# Altium PCB Audio-Player-v1.1.PcbDoc (part 2 of 3)
Units mil, origin at the board's own origin, x right, y up, seen from the top; angles counter-clockwise.
Board outline 4527.56 x 1574.8 mil, 4 copper layers (Top Layer, Ground, Power, Bottom Layer), stack 62.449 mil thick; 107 components, 72 nets, 372 pads, 147 vias.
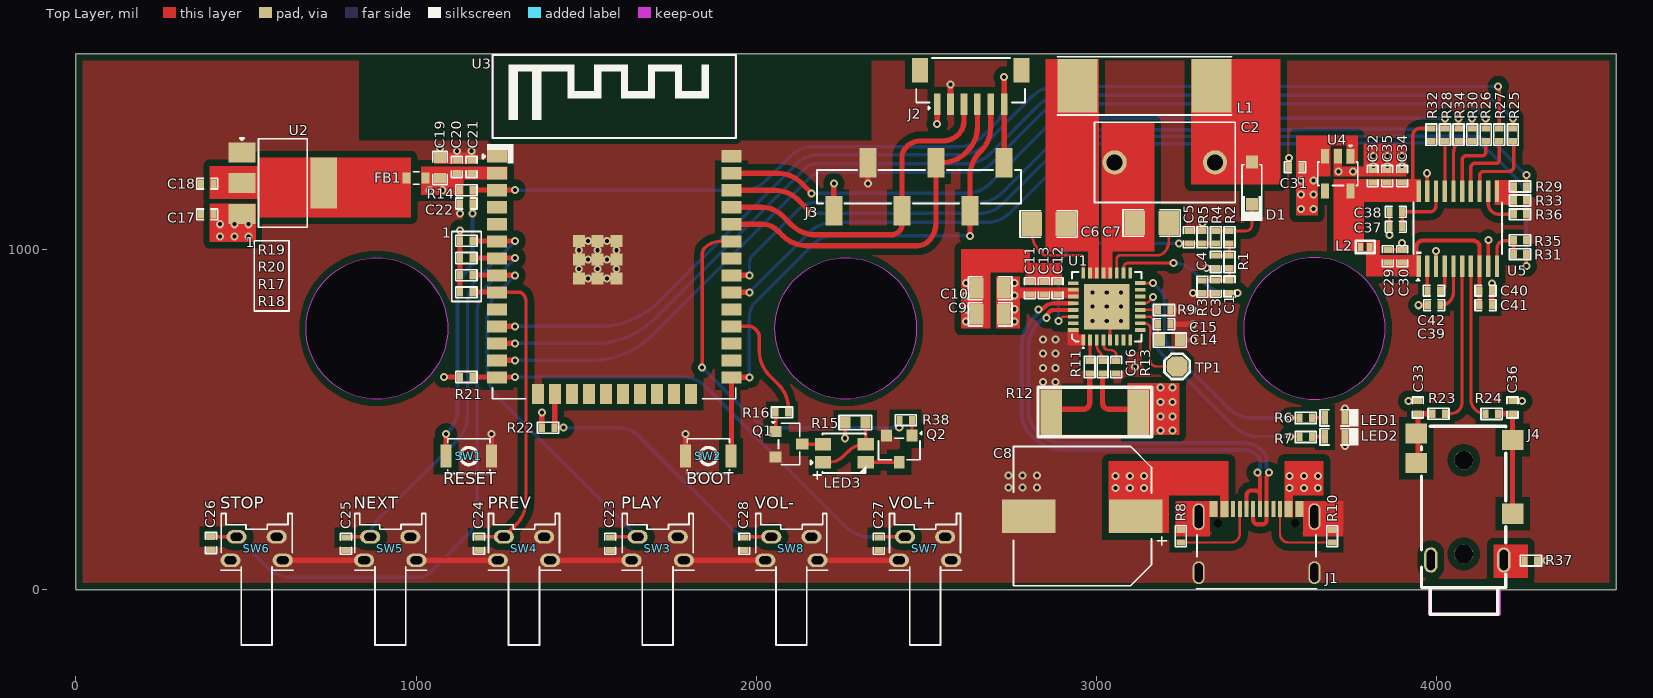
[diagram p0: Top Layer view]

## Part data (continued)
R1: library part RC0402FR-073K3L, "RES 3.3K OHM 1% 1/16W 0402", Case Code (Imperial)=0402, Case Code (Metric)=1005, LCSC Part Number=C137992, Manufacturer=Yageo, Max Operating Temperature=155°C, Max Power Dissipation=63mW, Min Operating Temperature=-55°C, Package Quantity=1, Power Rating=62.5mW, Resistance=3.3kR, Resistance Tolerance=1%, Resistor Type="Thick Film", Supplier Part Number 1=603-RC0402FR-073K3L, Temperature Coefficient=100ppm/°C, Voltage Rating=50V, Case/Package=0402, Category="Chip SMD Resistors", ComponentLink1Description=https://datasheet.ciiva.com/11808/0900766b80c66297-11808441.pdf?src-supplier=RSComponents, ComponentLink1URL=https://datasheet.ciiva.com/11808/0900766b80c66297-11808441.pdf?src-supplier=RSComponents, ComponentLink2Description=https://datasheet.ciiva.com/46394/1018594-46394940.pdf?src-supplier=Element14, ComponentLink2URL=https://datasheet.ciiva.com/46394/1018594-46394940.pdf?src-supplier=Element14, ComponentLink3Description=https://datasheet.ciiva.com/2453/pyu-r-int-thick-7-2453395.pdf?src-supplier=Digi-Key, ComponentLink3URL=https://datasheet.ciiva.com/2453/pyu-r-int-thick-7-2453395.pdf?src-supplier=Digi-Key, ComponentLink4Description=https://datasheet.ciiva.com/2453/pyu-r-int-thick-7-2453396.pdf?src-supplier=Digi-Key, ComponentLink4URL=https://datasheet.ciiva.com/2453/pyu-r-int-thick-7-2453396.pdf?src-supplier=Digi-Key, ComponentLink5Description=https://datasheet.ciiva.com/2453/pyu-r-int-thick-7-2453394.pdf?src-supplier=Digi-Key, ComponentLink5URL=https://datasheet.ciiva.com/2453/pyu-r-int-thick-7-2453394.pdf?src-supplier=Digi-Key, ComponentLink6Description=https://datasheet.ciiva.com/16746/pyu-rc0402-51-rohs-l-6-r-16746361.pdf?src-supplier=Future+Electronics, ComponentLink6URL=https://datasheet.ciiva.com/16746/pyu-rc0402-51-rohs-l-6-r-16746361.pdf?src-supplier=Future+Electronics, Construction=Rectangular, Depth=0.5mm, Features="Moisture Resistant", Height=0.016inch, Item Type=Resistor, Lead Free="Lead Free", Length=1mm, Manufacturer Part Number=RC0402FR-073K3L, Military Standard=Not, Number of Pins=2, Number of Terminations=2, Packaging="Tape and Reel", Pricing 1="1=0.10000, 10=0.01400, 50=0.01400, 100=0.00600, 1000=0.00300, 5000=0.00200, 10000=0.00100 (USD)", REACH SVHC="No SVHC", RoHS=Yes, RoHS Compliant=Yes, Series=RC, Size Code=0402, Stock 1=2413047, Supplier 1=Mouser, Technology="THICK FILM", Termination=SMD/SMT, Tolerance=1%, Voltage Rating (DC)=50V, Width=0.5mm
R2 R11 R13 R25 R26 R27 R28 R29 R30 R31 R37: library part RC0402FR-070RL, "RES 0 OHM JUMPER 1/16W 0402", Case Code (Imperial)=0402, Case Code (Metric)=1005, LCSC Part Number=C106231, Manufacturer=Yageo, Max Operating Temperature=155°C, Max Power Dissipation=63mW, Min Operating Temperature=-55°C, Power Rating=62.5mW, Resistor Type="Thick Film", Supplier Part Number 1=603-RC0402FR-070RL, Temperature Coefficient=200ppm/°C, Tolerance=1%, Voltage Rating=50V, Case/Package=0402, ComponentLink1Description=https://datasheet.ciiva.com/8896/pyu-rc0402-51-rohs-l-6-8896149.pdf?src-supplier=Avnet, ComponentLink1URL=https://datasheet.ciiva.com/8896/pyu-rc0402-51-rohs-l-6-8896149.pdf?src-supplier=Avnet, ComponentLink2Description=https://datasheet.ciiva.com/16790/pyu-rc0402-51-rohs-l-6-r-16790444.pdf?src-supplier=Future+Electronics, ComponentLink2URL=https://datasheet.ciiva.com/16790/pyu-rc0402-51-rohs-l-6-r-16790444.pdf?src-supplier=Future+Electronics, Contact Plating=Tin,Matte, Features="Moisture Resistant", Height=0.35mm, Item Type=Resistors, Lead Free="Lead Free", Length=1mm, Manufacturer Part Number=RC0402FR-070RL, Mount="Surface Mount", Number of Terminations=2, Packaging="Tape and Reel", Pricing 1="1=0.10000, 10=0.01400, 50=0.01400, 100=0.00600, 1000=0.00300, 5000=0.00200, 10000=0.00100 (USD)", Radiation Hardening=No, Resistance=0R, RoHS=Yes, RoHS Compliant=Yes, Series=RC, Size Code=0402, Stock 1=8556842, Supplier 1=Mouser, Termination=SMD/SMT, Width=0.5mm
R3: library part RC0402FR-0733KL, "RES 33K OHM 1% 1/16W 0402", LCSC Part Number=C138003, Manufacturer=YAGEO, Package=0402, ComponentLink1Description=LCSC, ComponentLink1URL=https://www.lcsc.com/product-detail/Chip-Resistor-Surface-Mount_YAGEO-RC0402FR-0733KL_C138003.html, Item Type=Resistor, Manufacturer Part Number=RC0402FR-0733KL
R4 R9: library part RT0402BRD07100KL, "RES SMD 100K OHM 0.1% 1/16W 0402", LCSC Part Number=C852472, Manufacturer=Yageo, Supplier Part Number=YAG1343CT-ND, Voltage Rating (DC)=50V, Category="Chip SMD Resistors", ComponentLink1Description=https://datasheet.ciiva.com/12724/pyu-rt-1-to-0-05-rohs-l-4-12724954.pdf?src-supplier=Mouser, ComponentLink1URL=https://datasheet.ciiva.com/12724/pyu-rt-1-to-0-05-rohs-l-4-12724954.pdf?src-supplier=Mouser, Item Type=Resistor, Manufacturer Part Number=RT0402BRD07100KL, Pricing="1=0.16, 10=0.121, 50=0.0958, 100=0.0859, 500=0.0654, 1000=0.0578, 5000=0.04283 (USD)", RoHS=Yes, Stock=62932, Supplier=Digikey
R5 R14 R17 R18 R19 R20 R21 R22 R32 R33 R34 R35 R36: library part RC0402FR-0710KL, "RES 10K OHM 1% 1/16W 0402", Case Code (Imperial)=0402, Case Code (Metric)=1005, LCSC Part Number=C60490, Manufacturer=Yageo, Max Operating Temperature=155°C, Max Power Dissipation=63mW, Min Operating Temperature=-55°C, Power Rating=62.5mW, Resistance=10kR, Resistance Tolerance=1%, Resistor Type="Thick Film", Supplier Part Number 1=603-RC0402FR-0710KL, Temperature Coefficient=100ppm/°C, Voltage Rating=50V, Case/Package=0402, Category="Chip SMD Resistors", ComponentLink1Description=https://datasheet.ciiva.com/7660/38568-7660787.pdf?src-supplier=Element14, ComponentLink1URL=https://datasheet.ciiva.com/7660/38568-7660787.pdf?src-supplier=Element14, ComponentLink2Description=https://datasheet.ciiva.com/7849/1686128-7849814.pdf?src-supplier=Element14, ComponentLink2URL=https://datasheet.ciiva.com/7849/1686128-7849814.pdf?src-supplier=Element14, ComponentLink3Description=https://datasheet.ciiva.com/7983/1018594-7983486.pdf?src-supplier=Element14, ComponentLink3URL=https://datasheet.ciiva.com/7983/1018594-7983486.pdf?src-supplier=Element14, ComponentLink4Description=https://datasheet.ciiva.com/22747/1018594-22747512.pdf?src-supplier=Element14, ComponentLink4URL=https://datasheet.ciiva.com/22747/1018594-22747512.pdf?src-supplier=Element14, ComponentLink5Description=https://datasheet.ciiva.com/12667/pyu-rc0402-51-rohs-l-6-r-12667067.pdf?src-supplier=Mouser, ComponentLink5URL=https://datasheet.ciiva.com/12667/pyu-rc0402-51-rohs-l-6-r-12667067.pdf?src-supplier=Mouser, ComponentLink6Description=https://datasheet.ciiva.com/7849/1784430-7849813.pdf?src-supplier=Element14, ComponentLink6URL=https://datasheet.ciiva.com/7849/1784430-7849813.pdf?src-supplier=Element14, ComponentLink7Description=https://datasheet.ciiva.com/7849/1784430-7849815.pdf?src-supplier=Element14, ComponentLink7URL=https://datasheet.ciiva.com/7849/1784430-7849815.pdf?src-supplier=Element14, Construction=Rectangular, Depth=0.5mm, Features="Moisture Resistant", Height=0.32mm, Item Type=Resistor, Lead Free="Lead Free", Lead Pitch=0.2mm, Length=1mm, Manufacturer Part Number=RC0402FR-0710KL, Military Standard=Not, Number of Pins=2, Number of Terminations=2, Packaging="Tape and Reel", Pricing 1="1=0.10000, 10=0.01400, 50=0.01400, 100=0.00500, 1000=0.00300, 10000=0.00200 (USD)", REACH SVHC="No SVHC", RoHS=Yes, RoHS Compliant=Yes, Series=RC, Stock 1=18648329, Supplier 1=Mouser, Termination=SMD/SMT, Tolerance=1%, Voltage Rating (DC)=50V, Width=0.5mm, Working Voltage=50V
R6 R7 R16 R38: library part RC0402FR-071KL, "RES 1K OHM 1% 1/16W 0402", Case Code (Imperial)=0402, Case Code (Metric)=1005, LCSC Part Number=C106235, Manufacturer=Yageo, Max Operating Temperature=155°C, Max Power Dissipation=63mW, Min Operating Temperature=-55°C, Power Rating=62.5mW, Resistance=1kR, Resistance Tolerance=1%, Resistor Type="Thick Film", Temperature Coefficient=100ppm/°C, Voltage Rating=50V, Case/Package=0402, Category="Chip SMD Resistors", ComponentLink1Description=https://datasheet.ciiva.com/11819/0900766b80c66297-11819477.pdf?src-supplier=RSComponents, ComponentLink1URL=https://datasheet.ciiva.com/11819/0900766b80c66297-11819477.pdf?src-supplier=RSComponents, ComponentLink2Description=https://datasheet.ciiva.com/7983/1018594-7983502.pdf?src-supplier=Element14, ComponentLink2URL=https://datasheet.ciiva.com/7983/1018594-7983502.pdf?src-supplier=Element14, ComponentLink3Description=https://datasheet.ciiva.com/22747/1018594-22747513.pdf?src-supplier=Element14, ComponentLink3URL=https://datasheet.ciiva.com/22747/1018594-22747513.pdf?src-supplier=Element14, ComponentLink4Description=https://datasheet.ciiva.com/12666/pyu-rc0402-51-rohs-l-6-r-12666741.pdf?src-supplier=Mouser, ComponentLink4URL=https://datasheet.ciiva.com/12666/pyu-rc0402-51-rohs-l-6-r-12666741.pdf?src-supplier=Mouser, ComponentLink5Description=https://datasheet.ciiva.com/7849/1018594-7849869.pdf?src-supplier=Element14, ComponentLink5URL=https://datasheet.ciiva.com/7849/1018594-7849869.pdf?src-supplier=Element14, ComponentLink6Description=https://datasheet.ciiva.com/7849/1018594-7849871.pdf?src-supplier=Element14, ComponentLink6URL=https://datasheet.ciiva.com/7849/1018594-7849871.pdf?src-supplier=Element14, ComponentLink7Description=https://datasheet.ciiva.com/17063/pyu-rc0402-51-rohs-l-6-r-17063193.pdf?src-supplier=Future+Electronics, ComponentLink7URL=https://datasheet.ciiva.com/17063/pyu-rc0402-51-rohs-l-6-r-17063193.pdf?src-supplier=Future+Electronics, Construction=Rectangular, Depth=0.5mm, Features="Moisture Resistant", Height=0.32mm, Item Type=Resistor, Lead Free="Lead Free", Length=1mm, Manufacturer Part Number=RC0402FR-071KL, Military Standard=Not, Number of Pins=2, Number of Terminations=2, Packaging="Tape and Reel", Pricing 1="10000=0.00085, 20000=0.00087, 40000=0.00084, 60000=0.00083, 80000=0.00079, 100000=0.00078, 1000000=0.00076 (USD)", Reach SVHC Compliant=Yes, RoHS=Yes, RoHS Compliant=Yes, Series=RC, Size Code=0402, Stock 1=13030000, Supplier 1=Avnet, Supplier Part Number 1=RC0402FR-071KL, Technology="THICK FILM", Termination=SMD/SMT, Tolerance=1%, Voltage Rating (DC)=50V, Width=0.5mm
R8 R10: library part RC0402FR-075K1L, "RES 5.1K OHM 1% 1/16W 0402", Case Code (Imperial)=0402, Case Code (Metric)=1005, LCSC Part Number=C105872, Manufacturer=Yageo, Max Operating Temperature=155°C, Max Power Dissipation=63mW, Min Operating Temperature=-55°C, Package Quantity=1, Resistance=5.1kR, Resistance Tolerance=1%, Resistor Type="Thick Film", Temperature Coefficient=100ppm/°C, Voltage Rating=50V, Case/Package=0402, Category="Chip SMD Resistors", ComponentLink1Description=https://datasheet.ciiva.com/7983/1018594-7983519.pdf?src-supplier=Element14, ComponentLink1URL=https://datasheet.ciiva.com/7983/1018594-7983519.pdf?src-supplier=Element14, ComponentLink2Description=https://datasheet.ciiva.com/46394/1018594-46394936.pdf?src-supplier=Element14, ComponentLink2URL=https://datasheet.ciiva.com/46394/1018594-46394936.pdf?src-supplier=Element14, ComponentLink3Description=https://datasheet.ciiva.com/2453/pyu-r-int-thick-7-2453401.pdf?src-supplier=Digi-Key, ComponentLink3URL=https://datasheet.ciiva.com/2453/pyu-r-int-thick-7-2453401.pdf?src-supplier=Digi-Key, ComponentLink4Description=https://datasheet.ciiva.com/2453/pyu-r-int-thick-7-2453402.pdf?src-supplier=Digi-Key, ComponentLink4URL=https://datasheet.ciiva.com/2453/pyu-r-int-thick-7-2453402.pdf?src-supplier=Digi-Key, ComponentLink5Description=https://datasheet.ciiva.com/2453/pyu-r-int-thick-7-2453400.pdf?src-supplier=Digi-Key, ComponentLink5URL=https://datasheet.ciiva.com/2453/pyu-r-int-thick-7-2453400.pdf?src-supplier=Digi-Key, ComponentLink6Description=https://datasheet.ciiva.com/12558/pyu-rc0402-51-rohs-l-6-r-8721-12558460.pdf?src-supplier=Mouser, ComponentLink6URL=https://datasheet.ciiva.com/12558/pyu-rc0402-51-rohs-l-6-r-8721-12558460.pdf?src-supplier=Mouser, ComponentLink7Description=https://datasheet.ciiva.com/16744/pyu-rc0402-51-rohs-l-6-r-16744283.pdf?src-supplier=Future+Electronics, ComponentLink7URL=https://datasheet.ciiva.com/16744/pyu-rc0402-51-rohs-l-6-r-16744283.pdf?src-supplier=Future+Electronics, ComponentLink8Description=https://datasheet.ciiva.com/15189/getdatasheetpartid-323636-15189493.pdf?src-supplier=Verical, ComponentLink8URL=https://datasheet.ciiva.com/15189/getdatasheetpartid-323636-15189493.pdf?src-supplier=Verical, Construction=Rectangular, Depth=0.5mm, Features="Moisture Resistant", Height=0.016inch, Item Type=Resistor, Lead Free="Lead Free", Length=1mm, Manufacturer Part Number=RC0402FR-075K1L, Military Standard=Not, Number of Terminations=2, Packaging="Tape and Reel", Power Rating=63mW, Pricing 1="10000=0.00085 (USD)", RoHS=Yes, RoHS Compliant=Yes, Series=RC, Stock 1=65000, Supplier 1=Avnet, Supplier Part Number 1=RC0402FR-075K1L, Technology="THICK FILM", Termination=SMD/SMT, Tolerance=1%, Voltage Rating (DC)=50V, Width=0.02inch, Working Voltage=50V
R12: library part PA2512FKE7W0R02E, "RES 0.02 OHM 1% 2W 2512", LCSC Part Number=C375689, Manufacturer=Yageo, ComponentLink1Description=https://datasheet.octopart.com/PA2512FKE7W0R02E-Yageo-datasheet-137700559.pdf?src-supplier=Newark, ComponentLink1URL=https://datasheet.octopart.com/PA2512FKE7W0R02E-Yageo-datasheet-137700559.pdf?src-supplier=Newark, Item Type=Resistor, Manufacturer Part Number=PA2512FKE7W0R02E, Pricing="1=0.79, 10=0.514, 25=0.4384, 50=0.3908, 100=0.3503, 250=0.306, 500=0.27824, 1000=0.25464 (USD)", RoHS=No, Stock=3212, Supplier=Digikey
R15: library part RC0603FR-07470RL, "RES 470 OHM 1% 1/10W 0603", Case Code (Imperial)=0603, Case Code (Metric)=1608, LCSC Part Number=C114669, Manufacturer=Yageo, Max Operating Temperature=155°C, Max Power Dissipation=100mW, Min Operating Temperature=-55°C, Package Quantity=1, Resistance Tolerance=1%, Resistor Type="Thick Film", Supplier Part Number 1=311-470HRCT-ND, Temperature Coefficient=100ppm/°C, Voltage Rating=50V, Working Voltage=75V, Case/Package=0603, Category="Chip SMD Resistors", ComponentLink1Description=https://datasheet.ciiva.com/11808/0900766b80f96399-11808177.pdf?src-supplier=RSComponents, ComponentLink1URL=https://datasheet.ciiva.com/11808/0900766b80f96399-11808177.pdf?src-supplier=RSComponents, ComponentLink2Description=https://datasheet.ciiva.com/7746/1738695-7746359.pdf?src-supplier=Element14, ComponentLink2URL=https://datasheet.ciiva.com/7746/1738695-7746359.pdf?src-supplier=Element14, ComponentLink3Description=https://datasheet.ciiva.com/7746/1738695-7746360.pdf?src-supplier=Element14, ComponentLink3URL=https://datasheet.ciiva.com/7746/1738695-7746360.pdf?src-supplier=Element14, ComponentLink4Description=https://datasheet.ciiva.com/7660/1868787-7660793.pdf?src-supplier=Element14, ComponentLink4URL=https://datasheet.ciiva.com/7660/1868787-7660793.pdf?src-supplier=Element14, ComponentLink5Description=https://datasheet.ciiva.com/46440/1868787-46440907.pdf?src-supplier=Element14, ComponentLink5URL=https://datasheet.ciiva.com/46440/1868787-46440907.pdf?src-supplier=Element14, ComponentLink6Description=https://datasheet.ciiva.com/2454/pyu-r-int-thick-7-2454012.pdf?src-supplier=Digi-Key, ComponentLink6URL=https://datasheet.ciiva.com/2454/pyu-r-int-thick-7-2454012.pdf?src-supplier=Digi-Key, ComponentLink7Description=https://datasheet.ciiva.com/2454/pyu-r-int-thick-7-2454013.pdf?src-supplier=Digi-Key, ComponentLink7URL=https://datasheet.ciiva.com/2454/pyu-r-int-thick-7-2454013.pdf?src-supplier=Digi-Key, ComponentLink8Description=https://datasheet.ciiva.com/2454/pyu-r-int-thick-7-2454014.pdf?src-supplier=Digi-Key, ComponentLink8URL=https://datasheet.ciiva.com/2454/pyu-r-int-thick-7-2454014.pdf?src-supplier=Digi-Key, Construction=Rectangular, Depth=0.8mm, Features="Moisture Resistant", Height=0.022inch, Lead Free="Lead Free", Length=1.6mm, Manufacturer Part Number=RC0603FR-07470RL, Military Standard=Not, Number of Terminations=2, Packaging="Tape and Reel", Power Rating=100mW, Pricing 1="1=0.10000, 10=0.02400, 100=0.00970, 1000=0.00436, 2500=0.00378 (USD)", REACH SVHC="No SVHC", Resistance=470R, RoHS=Yes, RoHS Compliant=Yes, Series=RC, Stock 1=154083, Supplier 1=Digi-Key, Technology="THICK FILM", Termination=SMD/SMT, Tolerance=1%, Width=0.031inch
R23 R24: library part RC0402FR-07470RL, "RES 470 OHM 1% 1/16W 0402", Case Code (Imperial)=0402, Case Code (Metric)=1005, LCSC Part Number=C114877, Manufacturer=Yageo, Max Operating Temperature=155°C, Max Power Dissipation=63mW, Min Operating Temperature=-55°C, Package Quantity=1, Power Rating=62.5mW, Resistance Tolerance=1%, Resistor Type="Thick Film", Temperature Coefficient=100ppm/°C, Voltage Rating=50V, Case/Package=0402, ComponentLink1Description=https://datasheet.ciiva.com/46412/1018594-46412838.pdf?src-supplier=Element14, ComponentLink1URL=https://datasheet.ciiva.com/46412/1018594-46412838.pdf?src-supplier=Element14, ComponentLink2Description=https://datasheet.ciiva.com/2453/pyu-r-int-thick-7-2453377.pdf?src-supplier=Digikey, ComponentLink2URL=https://datasheet.ciiva.com/2453/pyu-r-int-thick-7-2453377.pdf?src-supplier=Digikey, ComponentLink3Description=https://datasheet.ciiva.com/2453/pyu-r-int-thick-7-2453378.pdf?src-supplier=Digikey, ComponentLink3URL=https://datasheet.ciiva.com/2453/pyu-r-int-thick-7-2453378.pdf?src-supplier=Digikey, ComponentLink4Description=https://datasheet.ciiva.com/2453/pyu-r-int-thick-7-2453376.pdf?src-supplier=Digikey, ComponentLink4URL=https://datasheet.ciiva.com/2453/pyu-r-int-thick-7-2453376.pdf?src-supplier=Digikey, ComponentLink5Description=https://datasheet.ciiva.com/7850/1018594-7850015.pdf?src-supplier=Element14, ComponentLink5URL=https://datasheet.ciiva.com/7850/1018594-7850015.pdf?src-supplier=Element14, ComponentLink6Description=https://datasheet.ciiva.com/7850/1018594-7850014.pdf?src-supplier=Element14, ComponentLink6URL=https://datasheet.ciiva.com/7850/1018594-7850014.pdf?src-supplier=Element14, ComponentLink7Description=https://datasheet.ciiva.com/15189/getdatasheetpartid-330246-15189463.pdf?src-supplier=Verical, ComponentLink7URL=https://datasheet.ciiva.com/15189/getdatasheetpartid-330246-15189463.pdf?src-supplier=Verical, Construction=Rectangular, Depth=0.5mm, Features="Moisture Resistant", Height=0.016inch, Item Type=Resistor, Lead Free="Lead Free", Length=1mm, Manufacturer Part Number=RC0402FR-07470RL, Military Standard=Not, Number of Terminations=2, Packaging="Tape and Reel", Pricing="10000=0.00085 (USD)", Reach SVHC Compliant=No, RoHS=Yes, RoHS Compliant=Yes, Series=RC, Stock=10000, Supplier=Avnet, Supplier Part Number=RC0402FR-07470RL, Termination=SMD/SMT, Tolerance=1%, Voltage Rating (AC)=50V, Width=0.02inch, Working Voltage=50V
SW1 SW2: "SWITCH TACTILE SPST-NO 0.05A 12V", Contact Current Rating=50mA, Contact Resistance=100mR, Insulation Resistance=100MR, LCSC Part Number=C231329, Manufacturer=Omron, Max Operating Temperature=70°C, Max Voltage Rating (DC)=12V, Min Operating Temperature=-25°C, Operating Force=1.5N, Package Quantity=1, Ratings="Dust Proof,IP40", Supplier Part Number 1=SW1020DKR-ND, Actuator Length=0.4mm, Actuator Type=Standard, ComponentLink1Description=http://www.farnell.com/datasheets/60838.pdf?src-supplier=Farnell, ComponentLink1URL=http://www.farnell.com/datasheets/60838.pdf?src-supplier=Farnell, ComponentLink2Description=http://www.farnell.com/datasheets/60838.pdf?src-supplier=Element14, ComponentLink2URL=http://www.farnell.com/datasheets/60838.pdf?src-supplier=Element14, ComponentLink3Description=https://omronfs.omron.com/en_US/ecb/products/pdf/en-b3u.pdf?src-supplier=Digi-Key, ComponentLink3URL=https://omronfs.omron.com/en_US/ecb/products/pdf/en-b3u.pdf?src-supplier=Digi-Key, ComponentLink4Description=http://www.omron.com/ecb/products/pdf/en-b3u.pdf?src-supplier=Digi-Key, ComponentLink4URL=http://www.omron.com/ecb/products/pdf/en-b3u.pdf?src-supplier=Digi-Key, ComponentLink5Description=https://www.distrelec.biz/Web/Downloads/he/et/B3U_eng_datasheet.pdf?mime=application%2Fpdf&src-supplier=Distrelec, ComponentLink5URL=https://www.distrelec.biz/Web/Downloads/he/et/B3U_eng_datasheet.pdf?mime=application%2Fpdf&src-supplier=Distrelec, ComponentLink6Description=http://www.onlinecomponents.com/productFiles/mf-OM/en-b3u.pdf?src-supplier=Onlinecomponents.com, ComponentLink6URL=http://www.onlinecomponents.com/productFiles/mf-OM/en-b3u.pdf?src-supplier=Onlinecomponents.com, ComponentLink7Description=https://www.verical.com/server-webapp/html/getDatasheet?partID=552554&src-supplier=Verical, ComponentLink7URL=https://www.verical.com/server-webapp/html/getDatasheet?partID=552554&src-supplier=Verical, ComponentLink8Description=http://www.farnell.com/datasheets/1685550.pdf?src-supplier=Element14, ComponentLink8URL=http://www.farnell.com/datasheets/1685550.pdf?src-supplier=Element14, ComponentLink9Description=http://www.farnell.com/datasheets/2610940.pdf?src-supplier=Farnell, ComponentLink9URL=http://www.farnell.com/datasheets/2610940.pdf?src-supplier=Farnell, ComponentLink10Description=https://www.alliedelec.com/m/d/4c8a9ef82804fc3c241a13c1e298fd73.pdf?src-supplier=Allied+Electronics, ComponentLink10URL=https://www.alliedelec.com/m/d/4c8a9ef82804fc3c241a13c1e298fd73.pdf?src-supplier=Allied+Electronics, Contact Material=Silver, Current Rating=50mA, Depth=2.5mm, Electrical Life=200000Cycles, Height=1.2mm, Illumination Type=Non-Illuminated,Illuminated, Item Type=Switch, Lead Free="Lead Free", Length=4mm, Manufacturer Part Number=B3U-1000P, Max Current Rating=50mA, Mechanical Life=200000Cycles, Mount="Surface Mount", Orientation=Straight, Packaging="Tape and Reel", Pricing 1="1=1, 10=0.961, 25=0.9064, 50=0.7976, 100=0.7251, 250=0.68888, 500=0.67074, 1000=0.52571 (USD)", REACH SVHC=Unknown, Stock 1=116454, Supplier 1=Digi-Key, Switch Function=Off-Mom, Switch Travel=0.15mm, Termination=SMD/SMT, Throw Configuration=SPST, Voltage Rating (DC)=12V, Weight=0.000776oz, Width=3mm
SW3 SW4 SW5 SW6 SW7 SW8: "With Bracket 5mm 12V 5.3mm Round Button No SPST 50mA Through Hole Tactile Switches ROHS", LCSC Part Number=C5446822, Manufacturer=G-Switch, Package=Plugin, ComponentLink1Description=LCSC, ComponentLink1URL=https://www.lcsc.com/product-detail/C5446822.html?s_z=n_GT-TB092B-H090-L1, Item Type=Switch, Manufacturer Part Number=GT-TB092B-H090-L1
TP1: "Test Point ON", Item Type="TEST POINT"
U1: "4.5V~12V QFN-32-EP(5x5) Battery Management ROHS", LCSC Part Number=C515681, Manufacturer=INJOINIC, Package=QFN-32-EP(5x5), ComponentLink1Description=LCSC, ComponentLink1URL=https://lcsc.com/product-detail/Battery-Management_INJOINIC-IP6806_NF_C515681.html?s_z=n_IP6806, Item Type=IC, Manufacturer Part Number=IP6806_NF
U2: "IC REG LINEAR 3.3V 1.2A SOT223", Case/Package=TO-261-4, Dropout Voltage=600mV, LCSC Part Number=C435835, Manufacturer=STMicroelectronics, Max Input Voltage=18V, Max Operating Temperature=125°C, Min Operating Temperature=-40°C, Min Output Voltage=3.3V, Output Current=1.2A, Power Supply Rejection Ratio (PSRR)=65dB, Quiescent Current=500uA, Supplier Part Number 1=497-17239-6-ND, ComponentLink1Description=LCSC, ComponentLink1URL=https://www.lcsc.com/product-detail/Linear-Voltage-Regulators-LDO_STMicroelectronics-LDL1117S33R_C435835.html, Item Type=IC, Manufacturer Part Number=LDL1117S33R, Mount="Surface Mount", Number of Regulators=1, Output Configuration=Positive, Output Type=Fixed, Packaging="Tape and Reel", Pricing 1="1=0.45, 10=0.362, 100=0.2465, 500=0.1849, 1000=0.13867 (USD)", Stock 1=13064, Supplier 1=Digi-Key
U3: "RX TXRX MOD WIFI TRACE ANT SMD", LCSC Part Number=C701343, Manufacturer="Espressif Systems", Supplier Part Number 1=1965-ESP32-WROOM-32E-N16CT-ND, Category=Uncategorized, Item Type=IC, Manufacturer Part Number=ESP32-WROOM-32E-N16, Pricing 1="1=3.60000 (USD)", RoHS=No, Stock 1=16240, Supplier 1=Digi-Key
U4: "IC REG LINEAR 3.3V 300MA SOT23-5", LCSC Part Number=C156285, Manufacturer=Diodes, ComponentLink1Description=https://datasheet.ciiva.com/30016/ap2127-30016760.pdf?src-supplier=Avnet, ComponentLink1URL=https://datasheet.ciiva.com/30016/ap2127-30016760.pdf?src-supplier=Avnet, ComponentLink2Description=https://datasheet.ciiva.com/29569/ap2127-29569893.pdf?src-supplier=Digikey, ComponentLink2URL=https://datasheet.ciiva.com/29569/ap2127-29569893.pdf?src-supplier=Digikey, Item Type=IC, Manufacturer Part Number=AP2127K-3.3TRG1, Pricing="3000=0.0623, 6000=0.0623 (USD)", RoHS=Yes, Stock=45000, Supplier="Arrow Electronics"
U5: "IC DAC 16/24/32BIT 384K 20TSSOP", LCSC Part Number=595-PCM5102APWR, Manufacturer="Texas Instruments", ComponentLink1Description=https://datasheet.ciiva.com/24021/slas859a-261040-24021907.pdf?src-supplier=Mouser, ComponentLink1URL=https://datasheet.ciiva.com/24021/slas859a-261040-24021907.pdf?src-supplier=Mouser, ComponentLink2Description=https://datasheet.ciiva.com/29648/pcm5102a-29648362.pdf?src-supplier=Digikey, ComponentLink2URL=https://datasheet.ciiva.com/29648/pcm5102a-29648362.pdf?src-supplier=Digikey, ComponentLink3Description=https://datasheet.ciiva.com/6673/pcm5102a-6673611.pdf?src-supplier=Digikey, ComponentLink3URL=https://datasheet.ciiva.com/6673/pcm5102a-6673611.pdf?src-supplier=Digikey, Item Type=IC, Manufacturer Part Number=PCM5102APWR, Pricing="1=4.43, 10=3.32, 50=3.07, 100=2.75, 1000=2.36, 10000=2.35 (USD)", RoHS=Yes, Stock=2139, Supplier=Mouser

## Via types
v1: diameter 23.62, hole 11.81, Top Layer to Bottom Layer, tented both sides, 147 vias

## Nets (pads, with @x,y where several pads share a name; then routed paths per layer and width w, separated by ;. In a path a pad name is that pad's centre, name@x,y a point inside that pad or via, vN(x,y) a via of type N, cw(c..) or ccw(c..) an arc to the next point about the centre after c; other vN are vias at no path point)
3V3: C19.2 C20.2 C21.2 FB1.2 J2.1 J3.1 R14.2 R17.2 R18.2 R19.2 R20.2 R21.2 R22.2 U3.2 | length 415.7
  Top Layer w15.33: v1(1082.35,625) R21.2@1129.43,625 ; R18.2@1129.43,873.85 R17.2@1129.43,924.38 R20.2@1129.43,974.91 R19.2@1129.43,1025.44 v1(1129.43,1056.28) ; R22.2@1369.69,476 v1(1369.69,521) ; J3.1@2228,1113.27 v1@2228,1196.28 ; v1(2531.87,1369.15) J2.1@2531.87,1427.3
  other v1: 1040.11,1174 1077.11,1174 2228,1194
3V3#: C18.2 FB1.1 U2.2 U2.4
3V3-CODEC: C32.2 C34.2 C35.2 L2.1 R32.1 U4.5 U5.20 | length 206.1
  Top Layer w10: 3930,1195 3930,1334.06 cw(c3951.94,1334.06) 3951.94,1356 R32.1@3984.55,1356
5V: C8.1 C9.2 C10.2 C11.2 C12.2 C13.2 C17.2 C31.2 J1.A4/B9 J1.B4/A9 R15.1 U1.26 U1.27 U2.3 U4.1 U4.3 | length 46.2
  Top Layer w10: v1(2261,445) 2261.31,445.31 R15.1@2261.31,491.02
  other v1: 3055.92,298.09 3097.92,298.09 3139.92,298.09 3567.86,298.09 3609.86,298.09 3651.86,298.09 3055.92,334.09 3097.92,334.09 3139.92,334.09 3567.86,334.09 3609.86,334.09 3651.86,334.09 2759,788.2 2759,824.2 2759,865 2759,901 423.92,1038.09 465.92,1038.09 507.92,1038.09 423.92,1074.09 465.92,1074.09 507.92,1074.09 3601.97,1119.09 3637.97,1119.09 3601.97,1161.09 3637.97,1161.09 3601.97,1203.09 3637.97,1203.09
AGND: C29.1 C30.1 C32.1 C33.1 C34.1 C35.1 C36.1 C37.1 C38.1 C40.1 C41.1 C42.2 J4.1 R37.2 U4.2 U5.3 U5.9 U5.19 | length 644.7
  Top Layer w10: v1(3711.53,1229.5) 3716,1233.97 C34.1@3898.55,1233.97 ; C29.1@3856.05,998.54 C30.1@3898.55,998.54 v1(3898.55,1019.35) ; v1(3861,1043) 3861.55,1043 C37.1@3861.55,1066.37 C38.1@3861.55,1110.38 ; v1@3972.05,1229 3972.05,1171.47 U5.19@3972.69,1171.47 ; U5.3@3998.28,951 v1(3998.28,995.73) ; U5.9@4151.82,951 v1(4151.82,1027.25)
  Top Layer w15.33: v1(3917.7,554) C33.1@3945,554 ; v1(3947.2,836) C42.2@3974.5,836 ; C41.1@4162.32,836 C40.1@4162.32,879 v1(4162.32,899.5) ; C36.1@4223.14,554 v1(4250.44,554)
  other v1: 3972.05,1224 3754.52,1229.5 3813.88,1245.22 3855.88,1245.22 3897.88,1245.22 3813.88,1274.22 3855.88,1274.19 3897.88,1274.19
AVDD: C29.2 C30.2 C40.2 C41.2 L2.2 U5.1 U5.8 | length 438.3
  Top Layer w12: U5.1@3947.1,951 cw(c3947.1,957.3) 3940.8,957.3 3940.8,1007.54 cw(c3959.26,1007.54) 3959.26,1026 4106.94,1026 cw(c4106.94,1006.71) 4126.23,1006.71 U5.8@4126.23,951 4126.23,836.91 cw(c4125.32,836.91) C41.2@4125.32,836
DEMPH: R31.1 R35.2 U5.10 | length 155.8
  Top Layer w10: U5.10@4177.41,951 4177.41,1002.41 cw(c4201,1002.41) 4201,1026 4225.3,1026 ccw(c4225.3,1027.25) R35.2@4226.55,1027.25 R31.1@4226.55,986.17
EN: C22.2 J2.6 J3.6 R14.1 SW1.2 U3.3 | length 2803.9
  Top Layer w10: v1(1088,457) v1@1088.18,456.82 ; J3.6@2728,1255 ccw(c2726.25,1256.75) J3.6@2728.73,1256.75
  Top Layer w15.33: SW1.2@1088.18,392.61 v1@1088.18,456.82 ; v1(1166.43,1106.28) C22.2@1166.43,1135 R14.1@1166.43,1174 ; R14.1@1166.43,1174.5 U3.3@1238.11,1174.5 ; U3.3@1238.11,1174 cw(c1239.32,1172.79) 1239.32,1174.5 v1(1291,1174.5) ; J3.6@2728.73,1256.75 J2.6@2728.73,1427.3 v1(2728.73,1507)
  Bottom Layer w10: v1(1291,1174.5) 1959.24,1174.5 ccw(c1959.24,1274.5) 2029.95,1203.79 2100.67,1274.5 cw(c2167.06,1208.11) 2167.06,1302 2592.91,1302 ccw(c2592.91,1402) 2663.62,1331.29 2711.34,1379 ccw(c2627.73,1433.86) 2727.73,1433.86 2727.73,1504.59 cw(c2731.14,1504.59) v1(2728.73,1507)
  Bottom Layer w11.81: v1(1088,457) 1092.42,461.42 ccw(c1021.71,532.13) 1121.71,532.13 1121.71,868.47 cw(c1221.71,868.47) 1151,939.18 ccw(c1113.76,976.42) 1166.43,976.42 v1(1166.43,1106.28)
FILTER: R29.1 R33.2 U5.11
FORMAT: R30.1 R34.2 U5.16 | length 191.5
  Top Layer w10: U5.16@4049.46,1171.47 4049.46,1282.81 cw(c4100.65,1282.81) R34.2@4064.45,1319 R30.1@4104.41,1319
GND: C3.1 C4.1 C5.1 C8.2 C14.2 C15.2 C16.1 C17.1 C18.1 C19.1 C20.1 C21.1 C22.1 C23.1 C24.1 C25.1 C26.1 C27.1 C28.1 C31.1 J1.A1/B12 J1.B1/A12 J1.S1 J1.S2 J1.S3 J1.S4 J2.2 J3.2 LED1.2 LED2.2 Q1.2 Q2.2 R3.1 R5.1 R8.2 R9.2 R10.2 R11.1 R12.2 R33.1 R34.1 R35.1 R36.1 R37.1 SW1.1 SW2.1 SW3.2 SW3.3 SW3.4 SW4.2 SW4.3 SW4.4 SW5.2 SW5.3 SW5.4 SW6.2 SW6.3 SW6.4 SW7.2 SW7.3 SW7.4 SW8.2 SW8.3 SW8.4 U1.1 U1.32 U2.1 U3.1 U3.15 U3.38 U3.39 U3.39_11 U3.39_20 U3.40 U3.41 U3.42 U3.43 U3.44 U3.45 U3.46 U3.47 | length 2152.1
  Top Layer w10: v1@2328,1196.41 ccw(c2331.41,1196.41) v1(2329,1194) ; C5.1@3271.3,1054.4 R5.1@3311.4,1054.4 v1(3311.4,1077.9) ; R34.1@4064.45,1356 v1(4064.45,1385)
  Top Layer w15.33: SW6.4@608,86.26 SW5.3@847.46,86.26 ; SW5.4@1001,86.26 SW4.3@1240.46,86.26 ; v1(1129.43,1106.28) C22.1@1129.43,1135 ; SW1.1@1222.04,392.61 v1@1222.04,456.82 ; SW4.4@1394,86.26 SW3.3@1633.46,86.26 ; SW3.4@1787,86.26 SW8.3@2026.46,86.26 ; SW2.1@1792.32,392.61 v1@1792.32,456.82 ; SW8.4@2180,86.26 SW7.3@2419.46,86.26 ; v1@2328,1194 2328,1196.41 J3.2@2328,1255 ; J2.2@2571.24,1427.3 v1(2571.24,1485.44) ; R12.2@2873.05,522 cw(c2881.05,522) 2881.05,530 2961.41,530 ccw(c2961.41,548.59) 2980,548.59 R11.1@2980,635.5 ; C15.2@3217.5,780 v1(3283.8,780) ; R9.2@3217.5,822 v1(3283.8,822) ; C14.2@3246,733.6 v1(3283.8,733.6) ; v1(3283.8,872.2) C3.1@3351.2,872.2 ; v1(3323.9,944.8) C4.1@3351.2,944.8 ; C31.1@3565.5,1242 v1(3565.5,1269.23) ; v1(3730.53,421.7) LED2.2@3730.53,449 ; LED1.2@3730.53,505 v1(3730.53,532.3) ; R37.1@4295.74,85.32 v1(4323.04,85.32)
  other v1: 2740.96,299.72 2782.96,299.72 2824.96,299.72 2740.96,335.72 2782.96,335.72 2824.96,335.72 1221.86,457 1792.14,457 2843.31,609.78 2879.31,609.78 2843.31,651.78 2879.31,651.78 3112.98,654 2843.31,693.78 2879.31,693.78 2843.31,735.78 2879.31,735.78 1119.59,1289.72 1162.93,1289.72 1070.32,1297.72
I2S_BCK: R25.1 U5.13 | length 236.8
  Top Layer w10: U5.13@4126.23,1171.47 4126.23,1218.23 cw(c4137,1218.23) 4137,1229 4211,1229 ccw(c4211,1245) 4227,1245 R25.1@4227,1319
I2S_DIN: R27.1 U5.14 | length 222.2
  Top Layer w10: U5.14@4100.64,1171.47 4100.64,1241.24 cw(c4112.41,1241.24) 4112.41,1253 4175,1253 ccw(c4175,1262.31) 4184.31,1262.31 R27.1@4184.31,1319
I2S_LRCK: R26.1 U5.15 | length 206.9
  Top Layer w10: U5.15@4075.05,1171.47 4075.05,1262.31 cw(c4088.74,1262.31) 4088.74,1276 4135,1276 ccw(c4135,1285.36) 4144.36,1285.36 R26.1@4144.36,1319
I2S_SCK: R36.2 U5.12 | length 129.3
  Top Layer w10: U5.12@4151.82,1171.47 4151.82,1135.49 ccw(c4184.31,1135.49) 4184.31,1103 R36.2@4226.55,1103
IO0: J2.5 J3.5 SW2.2 U3.25 | length 1622.9
  Top Layer w15.33: SW2.2@1926.18,392.61 1927.09,392.61 U3.25@1927.09,624 v1(1979.68,624) ; v1(2628,1039.9) 2628,1215.59 cw(c2728,1215.59) 2657.29,1286.3 2660.07,1289.08 ccw(c2589.36,1359.79) 2689.36,1359.79 J2.5@2689.36,1427.3
  Bottom Layer w10: v1(1979.68,624) 1979.68,799.06 cw(c2055.85,799.06) 1990.98,838.98 2167.76,1015.76 cw(c2226.04,957.49) 2226.04,1039.9 v1(2628,1039.9)
IO12: C27.2 R21.1 SW7.1 U3.14 | length 1535.3
  Top Layer w10: U3.14@1238.11,624 U3.14@1238.11,625 ; C27.2@2360.1,153.5 cw(c2364.1,149.5) 2364.1,155.16 SW7.1@2437.17,155.16
  Top Layer w15.33: R21.1@1166.43,625 1238.11,625 v1(1291,625)
  Bottom Layer w10: v1(1291,625) 1781.58,625 cw(c1781.58,525) 1852.29,595.71 2263.55,184.45 ccw(c2334.26,255.16) 2334.26,155.16 SW7.1@2437.17,155.16